# Altium PCB FPGA电子琴.PcbDoc
Units mm, origin at the board's own origin, x right, y up, seen from the top; angles counter-clockwise.
Board outline 93.09 x 116.84 mm, 2 copper layers (Top Layer, Bottom Layer); 37 components, 51 nets, 275 pads, 0 vias.
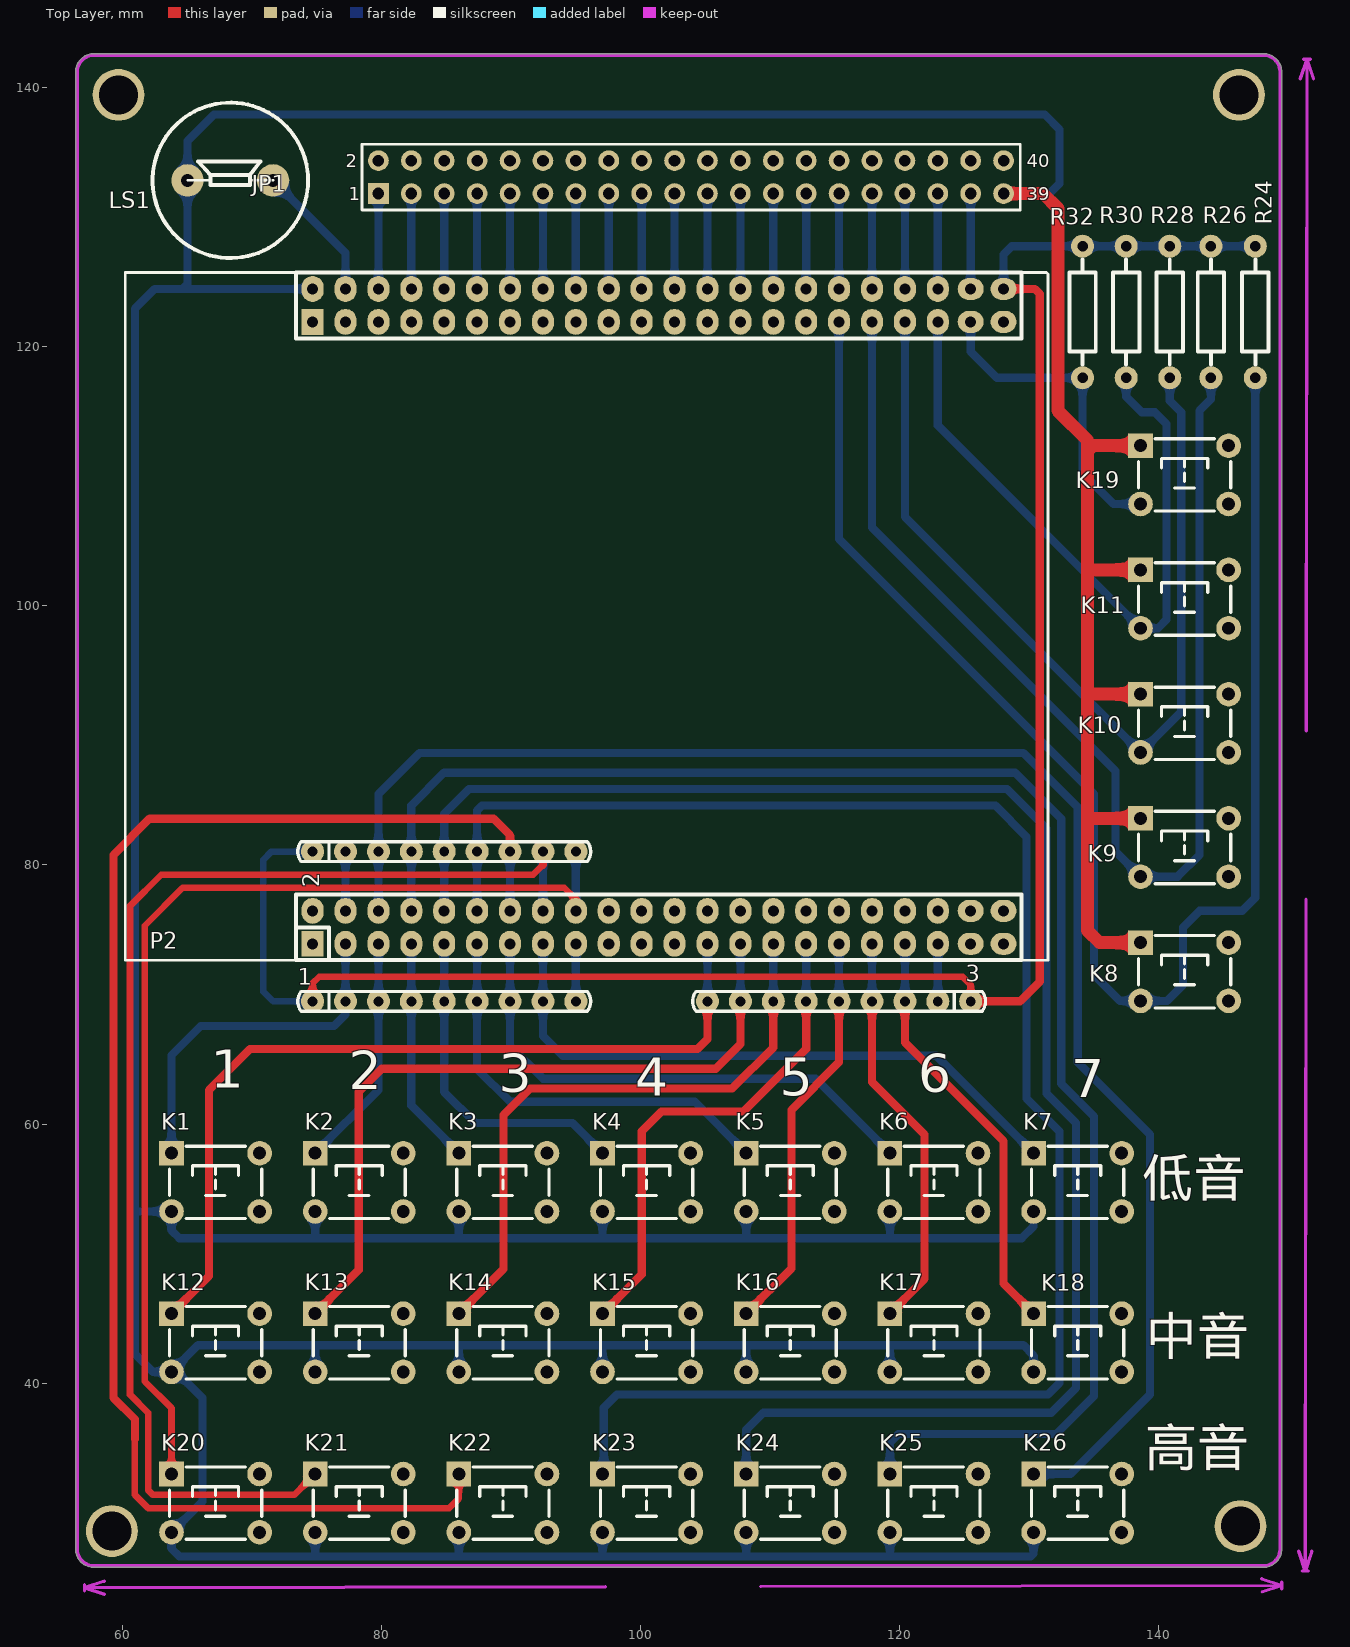
[diagram p0: Top Layer view]
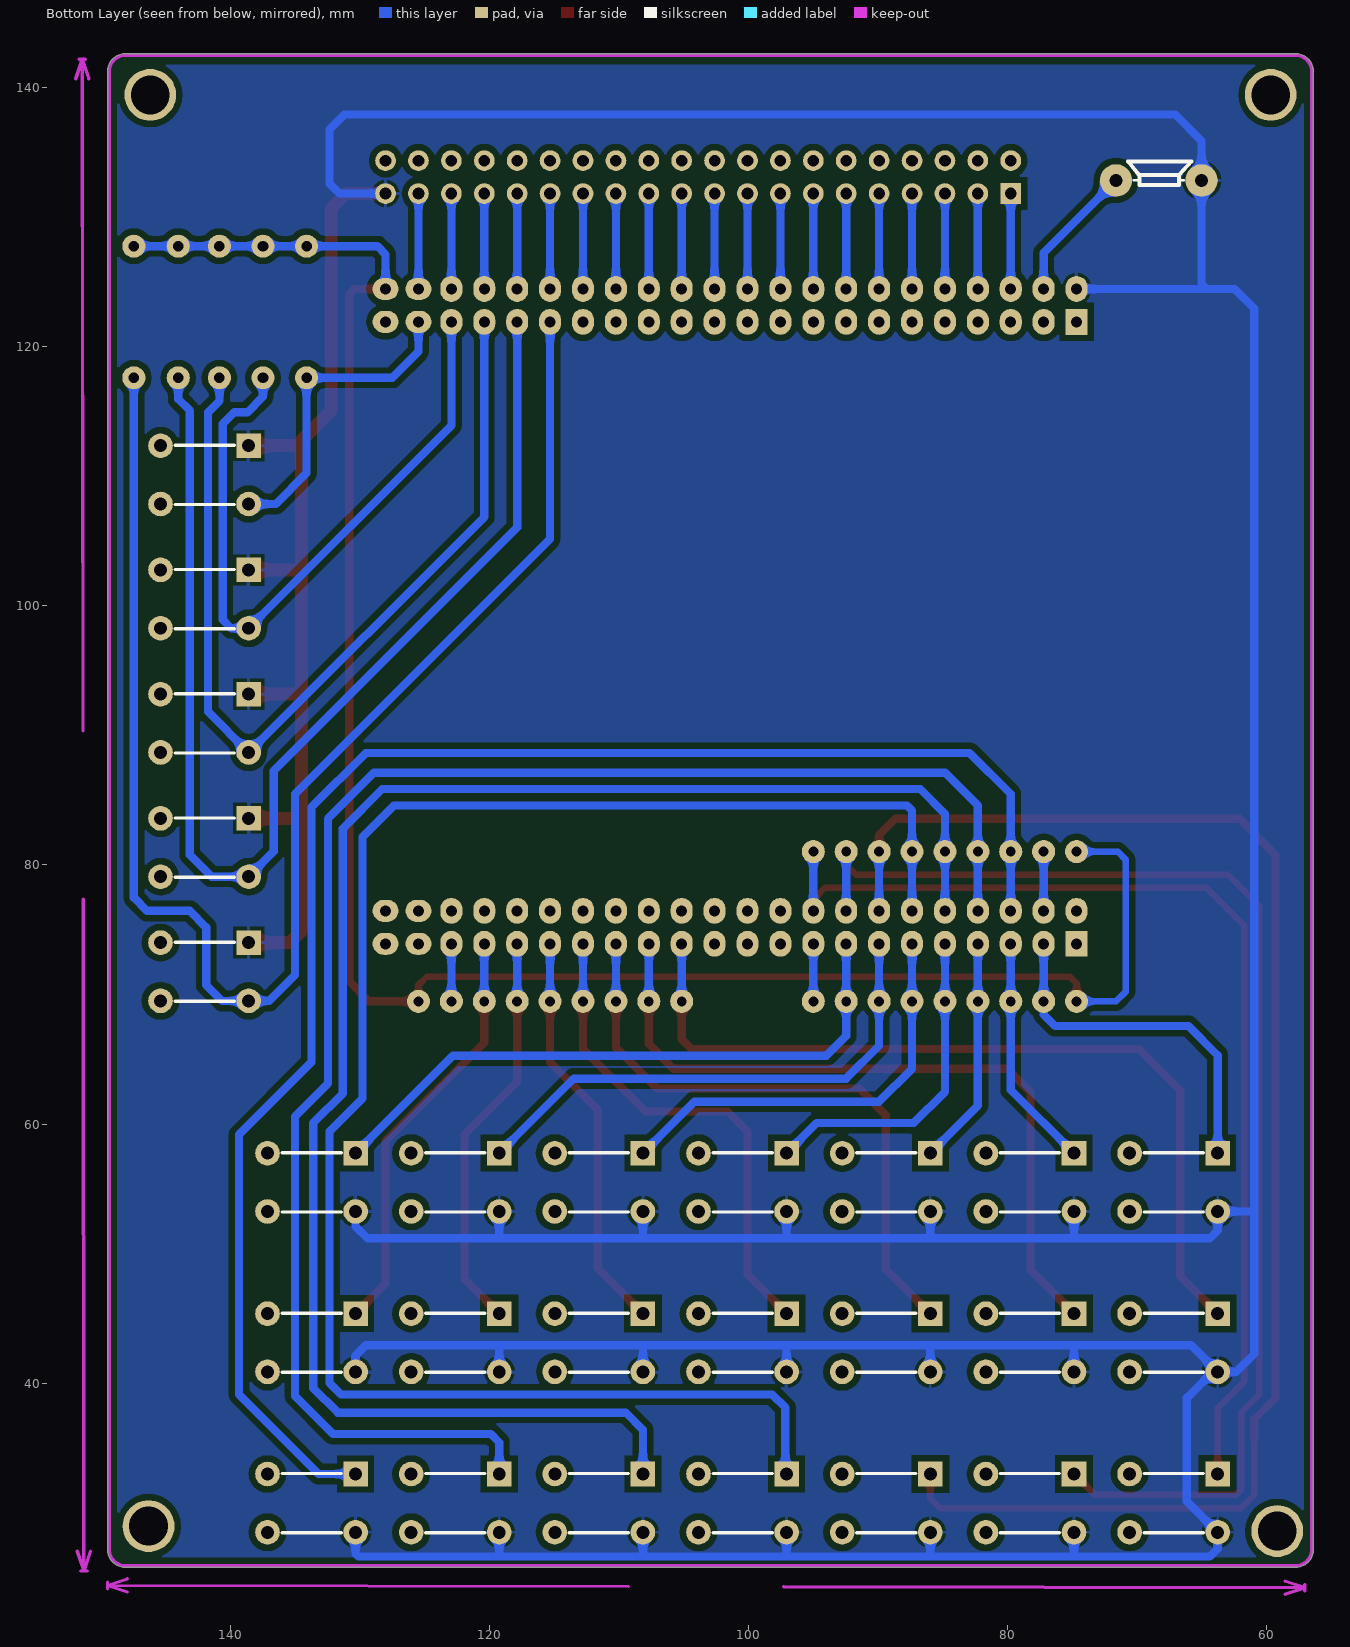
[diagram p1: Bottom Layer view, seen from below]

## Layer stack, top to bottom
Top Solder: solder mask 0.0102, Solder Resist, Dk 3.5
Top Layer: signal copper 0.0356
Dielectric 1: dielectric 0.32, FR-4, Dk 4.8
Bottom Layer: signal copper 0.0356
Bottom Solder: solder mask 0.0102, Solder Resist, Dk 3.5

## Board outline
56.388,27.178 ccw(c57.785,27.178) 57.605,25.792 ccw(c57.658,25.908) 57.658,25.781 148.082,25.781 ccw(c148.082,27.178) 149.479,27.178 149.479,141.224 ccw(c148.082,141.224) 148.082,142.621 147.701,142.621 ccw(c147.701,142.494) 147.691,142.621 59.319,142.621 ccw(c59.309,142.494) 59.309,142.621 57.785,142.621 ccw(c57.785,141.224) 56.388,141.224

## Design rules (kind name [scope] priority, off if disabled: settings)
Clearance Clearance_1 [InPolygon] p1: gap=0.5
Clearance [All] p2: gap=0.254
PolygonConnect [All] p1: connectstyle=Relief reliefconductorwidth=0.254 reliefentries=4 polygonreliefangle="90 Angle" airgapwidth=0.254
RoutingVias [All] p1: holewidth=0.711 width=1.27 viastyle="Through Hole" minholewidth=0.711 minwidth=1.27 maxholewidth=0.711 maxwidth=1.27
SolderMaskExpansion [All] p1: expansion=0.102
Width [All] p1: maxlimit=2 minlimit=0.254 preferedwidth=0.254
30 further rules are at their usual default settings.

## Components (designator, comment, footprint, x,y, rotation, side; value= is the part's Value field where it differs from the comment)
1 "4.7K" 排阻8位 74.676,69.469 r90 top
2 "4.7K" 排阻8位 74.676,81.026 r90 top
3 "4.7K" 排阻8位 125.476,69.469 r270 top
JP1 "Header 2X11" HDR2.54-LI-2x20P 103.886,133.096 r0 top
K1 "SW_PB" "SW DIP-6*6*5" 67.183,55.499 r0 top
K2 "SW_PB" "SW DIP-6*6*5" 78.274,55.499 r0 top
K3 "SW_PB" "SW DIP-6*6*5" 89.366,55.499 r0 top
K4 "SW_PB" "SW DIP-6*6*5" 100.457,55.499 r0 top
K5 "SW_PB" "SW DIP-6*6*5" 111.548,55.499 r0 top
K6 "SW_PB" "SW DIP-6*6*5" 122.64,55.499 r0 top
K7 "SW_PB" "SW DIP-6*6*5" 133.731,55.499 r0 top
K8 "SW-PB" "SW DIP-6*6*5" 141.986,71.755 r0 top
K9 "SW-PB" "SW DIP-6*6*5" 141.986,81.343 r0 top
K10 "SW-PB" "SW DIP-6*6*5" 141.986,90.932 r0 top
K11 "SW-PB" "SW DIP-6*6*5" 141.986,100.52 r0 top
K12 "SW_PB" "SW DIP-6*6*5" 67.183,43.116 r0 top
K13 "SW_PB" "SW DIP-6*6*5" 78.274,43.116 r0 top
K14 "SW_PB" "SW DIP-6*6*5" 89.366,43.116 r0 top
K15 "SW_PB" "SW DIP-6*6*5" 100.457,43.116 r0 top
K16 "SW_PB" "SW DIP-6*6*5" 111.548,43.116 r0 top
K17 "SW_PB" "SW DIP-6*6*5" 122.64,43.116 r0 top
K18 "SW_PB" "SW DIP-6*6*5" 133.731,43.116 r0 top
K19 "SW-PB" "SW DIP-6*6*5" 141.986,110.109 r0 top
K20 "SW_PB" "SW DIP-6*6*5" 67.183,30.734 r0 top
K21 "SW_PB" "SW DIP-6*6*5" 78.274,30.734 r0 top
K22 "SW_PB" "SW DIP-6*6*5" 89.366,30.734 r0 top
K23 "SW_PB" "SW DIP-6*6*5" 100.457,30.734 r0 top
K24 "SW_PB" "SW DIP-6*6*5" 111.548,30.734 r0 top
K25 "SW_PB" "SW DIP-6*6*5" 122.64,30.734 r0 top
K26 "SW_PB" "SW DIP-6*6*5" 133.731,30.734 r0 top
LS1 "SPEAKER2" 喇叭12X6.6 65.024,132.842 r0 top
P2 "FPGA EP2C5_BOARD" IDC88FPGA 74.676,73.914 r90 top locked
R24 "10k" AXIAL0.4 147.447,122.682 r90 top
R26 "10k" AXIAL0.4 144.018,122.682 r90 top
R28 "10k" AXIAL0.4 140.843,122.682 r90 top
R30 "10k" AXIAL0.4 137.477,122.682 r90 top
R32 "10k" AXIAL0.4 134.112,122.682 r90 top

## Footprints (in the part's own frame and the unit in brackets; to place one, negate y for a bottom-side part, rotate by r counter-clockwise, add the part's x,y. Pads: shape width x height; smd on the part's side, far side on the other; paste and mask are expansions set on the pad)
AXIAL0.4 [mil]
  round 70 hole 32: 1(-200,0) 2(200,0)
  silkscreen extent -160,-40 160,40, body extent -213,-44 209,44, height 94
HDR2.54-LI-2x20P [mm] "双排排针，20x2脚"
  rect 1.6x1.6 hole 0.9: 1(-24.13,-1.27)
  round 1.6 hole 0.9: 2(-24.13,1.27) 3(-21.59,-1.27) 4(-21.59,1.27) 5(-19.05,-1.27) 6(-19.05,1.27) 7(-16.51,-1.27) 8(-16.51,1.27) 9(-13.97,-1.27) 10(-13.97,1.27) 11(-11.43,-1.27) 12(-11.43,1.27) 13(-8.89,-1.27) 14(-8.89,1.27) 15(-6.35,-1.27) 16(-6.35,1.27) 17(-3.81,-1.27) 18(-3.81,1.27) 19(-1.27,-1.27) 20(-1.27,1.27) 21(1.27,-1.27) 22(1.27,1.27) 23(3.81,-1.27) 24(3.81,1.27) 25(6.35,-1.27) 26(6.35,1.27) 27(8.89,-1.27) 28(8.89,1.27) 29(11.43,-1.27) 30(11.43,1.27) 31(13.97,-1.27) 32(13.97,1.27) 33(16.51,-1.27) 34(16.51,1.27) 35(19.05,-1.27) 36(19.05,1.27) 37(21.59,-1.27) 38(21.59,1.27) 39(24.13,-1.27) 40(24.13,1.27)
  silkscreen extent -25.4,-2.54 25.4,2.54, body extent -25.4,-2.54 25.4,2.54, height 8.5
IDC88FPGA [mm]
  rect 2x1.7 hole 0.85: 1(0,0) 87(48.006,0)
  oval 2x1.7 hole 0.85: 2(2.54,0) 3(0,-2.54) 4(2.54,-2.54) 5(0,-5.08) 6(2.54,-5.08) 7(0,-7.62) 8(2.54,-7.62) 9(0,-10.16) 10(2.54,-10.16) 11(0,-12.7) 12(2.54,-12.7) 13(0,-15.24) 14(2.54,-15.24) 15(0,-17.78) 16(2.54,-17.78) 17(0,-20.32) 18(2.54,-20.32) 19(0,-22.86) 20(2.54,-22.86) 21(0,-25.4) 22(2.54,-25.4) 23(0,-27.94) 24(2.54,-27.94) 25(0,-30.48) 26(2.54,-30.48) 27(0,-33.02) 28(2.54,-33.02) 29(0,-35.56) 30(2.54,-35.56) 31(0,-38.1) 32(2.54,-38.1) 33(0,-40.64) 34(2.54,-40.64) 35(0,-43.18) 36(2.54,-43.18) 37(0,-45.72) 38(2.54,-45.72) 39(0,-48.26) 40(2.54,-48.26) 49(48.006,-48.26) 50(50.546,-48.26) 51(48.006,-45.72) 52(50.546,-45.72) 53(48.006,-43.18) 54(50.546,-43.18) 55(48.006,-40.64) 56(50.546,-40.64) 57(48.006,-38.1) 58(50.546,-38.1) 59(48.006,-35.56) 60(50.546,-35.56) 61(48.006,-33.02) 62(50.546,-33.02) 63(48.006,-30.48) 64(50.546,-30.48) 65(48.006,-27.94) 66(50.546,-27.94) 67(48.006,-25.4) 68(50.546,-25.4) 69(48.006,-22.86) 70(50.546,-22.86) 71(48.006,-20.32) 72(50.546,-20.32) 73(48.006,-17.78) 74(50.546,-17.78) 75(48.006,-15.24) 76(50.546,-15.24) 77(48.006,-12.7) 78(50.546,-12.7) 79(48.006,-10.16) 80(50.546,-10.16) 81(48.006,-7.62) 82(50.546,-7.62) 83(48.006,-5.08) 84(50.546,-5.08) 85(48.006,-2.54) 86(50.546,-2.54) 88(50.546,0)
  oval 1.7x2 hole 0.85: 41(0,-50.8) 42(2.54,-50.8) 43(0,-53.34) 44(2.54,-53.34) 45(48.006,-53.34) 46(50.546,-53.34) 47(48.006,-50.8) 48(50.546,-50.8)
  silkscreen extent -1.27,-56.77 51.82,14.48
"SW DIP-6*6*5" [mm] "6*6*5mm"
  rect 1.9x1.9 hole 1: 1(-3.4,2.25)
  round 1.9 hole 1: 2(-3.4,-2.25) 3(3.4,-2.25) 4(3.4,2.25)
  silkscreen extent -3.56,-2.79 3.56,2.79, body extent -4.11,-3 4.11,3, height 4.95
喇叭12X6.6 [mm]
  round 2.5 hole 1: 1(0,0) 2(6.6,0)
  silkscreen extent -2.7,-6 9.3,6
排阻8位 [mil]
  round 70 hole 30: 1(0,0) 2(0,-100) 3(0,-200) 4(0,-300) 5(0,-400) 6(0,-500) 7(0,-600) 8(0,-700) 9(0,-800)
  silkscreen extent -30,-845 30,45

## Part data
1 2 3: library part RES8
JP1: library part "Header 20X2", "20*2P接插件"
K1 K2 K3 K4 K5 K6 K7 K12 K13 K14 K15 K16 K17 K18 K20 K21 K22 K23 K24 K25 K26: "微动开关"
LS1: "喇叭"
P2: library part EP2C5_BOARD, "FPGA"
R24 R26 R28 R30 R32: library part RES2

## Free pads (board coordinates)
  round 4 hole 3: 0(59.182,28.575) 0(59.69,139.446) 0(146.177,139.446) 0(146.304,28.956)

## Nets (pads, with @x,y where several pads share a name; then routed paths per layer and width w, separated by ;. In a path a pad name is that pad's centre, name@x,y a point inside that pad or via, vN(x,y) a via of type N, cw(c..) or ccw(c..) an arc to the next point about the centre after c; other vN are vias at no path point)
GND: JP1.39 K1.2 K2.2 K3.2 K4.2 K5.2 K6.2 K7.2 K8.1 K9.1 K10.1 K11.1 K12.2 K13.2 K14.2 K15.2 K16.2 K17.2 K18.2 K19.1 K20.2 K21.2 K22.2 K23.2 K24.2 K25.2 K26.2 LS1.1 P2.88 | length 526.6
  Top Layer w1: JP1.39 131.064,131.826 132.207,130.683 132.207,115.062 134.493,112.776 134.493,111.942 ; K8.1 135.418,74.005 134.493,74.93 134.493,83.693 ; K9.1 134.592,83.594 134.493,83.693 ; K10.1 134.584,93.182 134.493,93.091 ; K11.1 134.521,102.771 134.493,102.743 ; K19.1 134.91,112.359 134.493,111.942 ; 134.493,83.693 134.493,93.091 ; 134.493,93.091 134.493,102.743 ; 134.493,102.743 134.493,111.942
  Bottom Layer w0.635: P2.88 64.643,124.46 ; K21.2 74.874,26.662 74.93,26.607 ; K13.2 74.874,42.87 74.93,42.926 ; K2.2 74.874,51.237 74.93,51.181 ; K22.2 85.966,26.72 85.852,26.607 ; K14.2 85.966,42.786 86.106,42.926 ; K3.2 85.966,51.295 85.852,51.181 ; K23.2 97.057,26.762 96.901,26.607 ; K15.2 97.057,42.828 97.155,42.926 ; K4.2 97.057,51.337 96.901,51.181 ; K24.2 108.148,26.805 107.95,26.607 ; K16.2 108.148,42.855 108.077,42.926 ; K5.2 108.148,51.379 107.95,51.181 ; K25.2 119.24,26.62 119.253,26.607 ; K17.2 119.24,42.913 119.253,42.926 ; K6.2 119.24,51.194 119.253,51.181 ; JP1.39 131.572,131.826 132.334,132.588 132.334,136.779 131.191,137.922 67.056,137.922 65.024,135.89 LS1.1 65.024,124.841 64.643,124.46 ; K26.2 130.331,26.826 130.112,26.607 119.253,26.607 ; K18.2 130.331,42.135 129.54,42.926 119.253,42.926 ; K7.2 130.331,52.099 129.413,51.181 119.253,51.181 ; 60.96,53.34 60.96,42.263 62.357,40.866 K12.2 ; 60.96,53.34 60.96,122.936 62.484,124.46 64.643,124.46 ; 60.96,53.34 61.051,53.249 K1.2 63.783,51.787 64.389,51.181 74.93,51.181 ; K12.2 64.163,40.866 66.167,38.862 66.167,30.868 K20.2 63.783,27.213 64.389,26.607 74.93,26.607 ; K12.2 65.842,42.926 74.93,42.926 ; 74.93,26.607 85.852,26.607 ; 74.93,42.926 86.106,42.926 ; 74.93,51.181 85.852,51.181 ; 85.852,26.607 96.901,26.607 ; 85.852,51.181 96.901,51.181 ; 86.106,42.926 97.155,42.926 ; 96.901,26.607 107.95,26.607 ; 96.901,51.181 107.95,51.181 ; 97.155,42.926 108.077,42.926 ; 107.95,26.607 119.253,26.607 ; 107.95,51.181 119.253,51.181 ; 108.077,42.926 119.253,42.926
H1: 2.9 K20.1 P2.18 | length 83.5
  Top Layer w0.508: K20.1 63.783,38.071 61.722,40.132 61.722,75.311 64.643,78.232 94.107,78.232 94.996,77.343 P2.18
  Bottom Layer w0.635: P2.18 2.9
H2: 2.8 K21.1 P2.16 | length 98.2
  Top Layer w0.508: K21.1 73.259,31.369 62.357,31.369 61.976,31.75 61.976,37.719 60.579,39.116 60.579,76.835 62.992,79.248 91.694,79.248 92.456,80.01
  Top Layer w0.635: 92.456,80.01 2.8
  Bottom Layer w0.635: P2.16 2.8
H3: 2.7 K22.1 P2.14 | length 115.8
  Top Layer w0.508: 60.96,35.687 60.96,31.369 61.976,30.353 85.217,30.353 85.966,31.102 K22.1
  Top Layer w0.635: 60.96,35.687 60.96,37.211 59.309,38.862 59.309,80.772 62.103,83.566 88.646,83.566 89.916,82.296 2.7
  Bottom Layer w0.635: P2.14 2.7
H4: 2.6 K23.1 P2.12 | length 135.7
  Bottom Layer w0.635: P2.12 2.6 87.376,84.201 87.757,84.582 127.381,84.582 129.794,82.169 129.794,61.976 132.334,59.436 132.334,40.005 131.445,39.116 98.171,39.116 97.155,38.1 97.155,33.082 K23.1
H5: 2.5 K24.1 P2.10 | length 130.4
  Bottom Layer w0.635: P2.10 2.5 84.836,83.947 86.741,85.852 128.27,85.852 131.318,82.804 131.318,62.357 133.604,60.071 133.604,39.624 131.699,37.719 109.474,37.719 108.148,36.393 K24.1
H6: 2.4 K25.1 P2.8 | length 126.1
  Bottom Layer w0.635: P2.8 2.4 82.296,84.582 84.836,87.122 128.905,87.122 132.461,83.566 132.461,63.119 135.001,60.579 135.001,38.989 132.08,36.068 119.888,36.068 119.24,35.42 K25.1
H7: 2.3 K26.1 P2.6 | length 125.2
  Bottom Layer w0.635: P2.6 2.3 79.756,85.471 82.931,88.646 129.54,88.646 133.731,84.455 133.731,64.77 139.319,59.182 139.319,39.116 133.187,32.984 K26.1
H8: 2.2 P2.4 | length 4.6
  Bottom Layer w0.635: P2.4 2.2
KEY1: K8.2 P2.55 R24.1 | length 117.9
  Bottom Layer w0.635: P2.55 115.316,105.156 135.001,85.471 135.001,71.501 136.997,69.505 K8.2 140.625,69.505 141.859,70.739 141.859,75.184 143.129,76.454 146.431,76.454 147.447,77.47 R24.1
KEY2: K9.2 P2.53 R26.1 | length 93.8
  Bottom Layer w0.635: P2.53 117.856,106.045 136.652,87.249 136.652,81.027 K9.2 141.45,79.093 143.129,80.772 143.129,115.062 144.018,115.951 R26.1
KEY3: K10.2 P2.51 R28.1 | length 71.4
  Bottom Layer w0.635: P2.51 120.396,106.872 K10.2 141.732,91.828 141.732,114.935 140.843,115.824 R28.1
KEY4: K11.2 P2.49 R30.1 | length 53
  Bottom Layer w0.635: P2.49 122.936,113.92 K11.2 139.926,98.27 140.589,98.933 140.589,114.046 139.7,114.935 138.684,114.935 137.477,116.141 R30.1
KEY5: K19.2 P2.47 R32.1 | length 24.6
  Bottom Layer w0.635: P2.47 125.476,119.634 127.508,117.602 R32.1 134.112,110.236 136.489,107.859 K19.2
L1: 1.2 K1.1 P2.3 | length 27.8
  Bottom Layer w0.635: K1.1 63.783,65.307 66.04,67.564 76.327,67.564 77.216,68.453 1.2 P2.3
L2: 1.3 K2.1 P2.5 | length 18.2
  Bottom Layer w0.635: K2.1 79.756,62.631 1.3 P2.5
L3: 1.4 K3.1 P2.7 | length 17.7
  Bottom Layer w0.635: P2.7 1.4 82.296,61.419 K3.1
L4: 1.5 K4.1 P2.9 | length 25.6
  Bottom Layer w0.635: P2.9 1.5 84.836,62.484 87.249,60.071 94.735,60.071 K4.1
L5: 1.6 K5.1 P2.11 | length 33.1
  Bottom Layer w0.635: P2.11 1.6 87.376,64.262 89.916,61.722 104.175,61.722 K5.1
L6: 1.7 K6.1 P2.13 | length 40.6
  Bottom Layer w0.635: P2.13 1.7 89.916,66.04 92.456,63.5 113.489,63.5 K6.1
L7: 1.8 K7.1 P2.15 | length 48.7
  Bottom Layer w0.635: P2.15 1.8 92.456,66.802 93.98,65.278 122.802,65.278 K7.1
L8: 1.9 P2.17 | length 4.4
  Bottom Layer w0.635: 1.9 P2.17
M1: 3.9 K12.1 P2.25 | length 65.9
  Top Layer w0.635: K12.1 66.675,48.259 66.675,62.611 69.85,65.786 104.394,65.786 105.156,66.548 3.9
  Bottom Layer w0.635: 3.9 P2.25
M2: 3.8 K13.1 P2.27 | length 57.2
  Top Layer w0.635: K13.1 78.232,48.724 78.232,62.484 80.01,64.262 105.791,64.262 107.696,66.167 3.8
  Bottom Layer w0.635: 3.8 P2.27
M3: 3.7 K14.1 P2.29 | length 47.8
  Top Layer w0.635: K14.1 89.408,48.809 89.408,60.706 91.44,62.738 107.061,62.738 110.236,65.913 3.7
  Bottom Layer w0.635: 3.7 P2.29
M4: 3.6 K15.1 P2.31 | length 38.8
  Top Layer w0.635: K15.1 100.076,48.386 100.076,59.436 101.6,60.96 107.95,60.96 112.776,65.786 3.6
  Bottom Layer w0.635: 3.6 P2.31
M5: 3.5 K16.1 P2.33 | length 31.5
  Top Layer w0.635: K16.1 111.633,48.851 111.633,61.087 115.316,64.77 3.5
  Bottom Layer w0.635: 3.5 P2.33
M6: 3.4 K17.1 P2.35 | length 31.3
  Top Layer w0.635: 3.4 117.856,63.246 121.92,59.182 121.92,48.047 K17.1
  Bottom Layer w0.635: 3.4 P2.35
M7: 3.3 K18.1 P2.37 | length 32.7
  Top Layer w0.635: 3.3 120.396,66.294 128.016,58.674 128.016,47.681 K18.1
  Bottom Layer w0.635: 3.3 P2.37
M8: 3.2 P2.39 | length 4.4
  Bottom Layer w0.635: 3.2 P2.39
NetJP1_1: JP1.1 P2.84 | length 7.4
  Bottom Layer w0.635: P2.84 JP1.1
NetJP1_3: JP1.3 P2.82 | length 7.4
  Bottom Layer w0.635: P2.82 JP1.3
NetJP1_5: JP1.5 P2.80 | length 7.4
  Bottom Layer w0.635: P2.80 JP1.5
NetJP1_7: JP1.7 P2.78 | length 7.4
  Bottom Layer w0.635: P2.78 JP1.7
NetJP1_9: JP1.9 P2.76 | length 7.4
  Bottom Layer w0.635: P2.76 JP1.9
NetJP1_11: JP1.11 P2.74 | length 7.4
  Bottom Layer w0.635: P2.74 JP1.11
NetJP1_13: JP1.13 P2.72 | length 7.4
  Bottom Layer w0.635: P2.72 JP1.13
NetJP1_15: JP1.15 P2.70 | length 7.4
  Bottom Layer w0.635: P2.70 JP1.15
NetJP1_17: JP1.17 P2.68 | length 7.4
  Bottom Layer w0.635: P2.68 JP1.17
NetJP1_19: JP1.19 P2.66 | length 7.4
  Bottom Layer w0.635: P2.66 JP1.19
NetJP1_21: JP1.21 P2.64 | length 7.4
  Bottom Layer w0.635: P2.64 JP1.21
NetJP1_23: JP1.23 P2.62 | length 7.4
  Bottom Layer w0.635: P2.62 JP1.23
NetJP1_25: JP1.25 P2.60 | length 7.4
  Bottom Layer w0.635: P2.60 JP1.25
NetJP1_27: JP1.27 P2.58 | length 7.4
  Bottom Layer w0.635: P2.58 JP1.27
NetJP1_29: JP1.29 P2.56 | length 7.4
  Bottom Layer w0.635: P2.56 JP1.29
NetJP1_31: JP1.31 P2.54 | length 7.4
  Bottom Layer w0.635: P2.54 JP1.31
NetJP1_33: JP1.33 P2.52 | length 7.4
  Bottom Layer w0.635: P2.52 JP1.33
NetJP1_35: JP1.35 P2.50 | length 7.4
  Bottom Layer w0.635: P2.50 JP1.35
NetJP1_37: JP1.37 P2.48 | length 7.4
  Bottom Layer w0.635: P2.48 JP1.37
NetLS1_2: LS1.2 P2.86 | length 10.7
  Bottom Layer w0.635: LS1.2 77.216,127.25 P2.86
VCCIO: 1.1 2.1 3.1 P2.46 R24.2 R26.2 R28.2 R30.2 R32.2 | length 156.8
  Top Layer w0.508: 1.1 74.676,70.866 75.184,71.374 124.841,71.374 125.476,70.739 3.1
  Top Layer w0.635: 3.1 129.286,69.469 130.81,70.993 130.81,124.079 130.429,124.46 P2.46
  Bottom Layer w0.508: 1.1 71.628,69.469 70.866,70.231 70.866,80.391 71.501,81.026 2.1
  Bottom Layer w0.635: P2.46 128.016,127.127 128.651,127.762 R32.2 R30.2 R28.2 R24.2@147.574,127.762
pads on no net: JP1.2 JP1.4 JP1.6 JP1.8 JP1.10 JP1.12 JP1.14 JP1.16 JP1.18 JP1.20 JP1.22 JP1.24 JP1.26 JP1.28 JP1.30 JP1.32 JP1.34 JP1.36 JP1.38 JP1.40 K1.3 K1.4 K2.3 K2.4 K3.3 K3.4 K4.3 K4.4 K5.3 K5.4 K6.3 K6.4 K7.3 K7.4 K8.3 K8.4 K9.3 K9.4 K10.3 K10.4 K11.3 K11.4 K12.3 K12.4 K13.3 K13.4 K14.3 K14.4 K15.3 K15.4 K16.3 K16.4 K17.3 K17.4 K18.3 K18.4 K19.3 K19.4 K20.3 K20.4 K21.3 K21.4 K22.3 K22.4 K23.3 K23.4 K24.3 K24.4 K25.3 K25.4 K26.3 K26.4 P2.1 P2.2 P2.19 P2.20 P2.21 P2.22 P2.23 P2.24 P2.26 P2.28 P2.30 P2.32 P2.34 P2.36 P2.38 P2.40 P2.41 P2.42 P2.43 P2.44 P2.45 P2.57 P2.59 P2.61 P2.63 P2.65 P2.67 P2.69 P2.71 P2.73 P2.75 P2.77 P2.79 P2.81 P2.83 P2.85 P2.87

## Polygon pours and split planes (outlines as drawn)
GND on Bottom Layer "Bottom Layer-No Net" (solid, remove dead copper, pour order 2): 56.642,142.875 57.758,141.759 149.373,141.759 149.373,26.308 147.954,24.889 147.062,25.781 56.388,25.781 56.388,142.494

## Keep-outs
Keep-Out Layer:
  lines w0.254: 57.062,24.455 57.063,23.947 ; 57.658,25.908 147.447,25.908 ; 57.785,25.908 cw(c57.785,27.178) 56.515,27.178 56.515,141.224 cw(c57.785,141.224) 57.785,142.494 59.309,142.494 ; 58.586,24.712 57.063,24.201 ; 58.588,23.696 57.063,24.201 ; 58.674,142.494 147.955,142.494 ; 97.278,24.281 57.063,24.201 ; 109.264,24.305 149.479,24.384 ; 146.685,25.908 148.082,25.908 ccw(c148.082,27.178) 149.352,27.178 149.352,28.956 ; 147.701,142.494 148.082,142.494 cw(c148.082,141.224) 149.352,141.224 149.352,140.081 ; 147.954,24.889 149.479,24.384 ; 147.956,23.873 149.479,24.384 ; 149.352,27.559 149.352,140.462 ; 149.48,24.13 149.478,24.638 ; 150.796,27.012 151.302,25.488 ; 150.919,140.677 151.429,142.201 ; 151.048,25.488 151.556,25.488 ; 151.175,142.201 151.683,142.201 ; 151.359,77.344 151.302,25.488 ; 151.373,90.345 151.429,142.201 ; 151.812,27.011 151.302,25.488 ; 151.935,140.676 151.429,142.201
  text "116.713mm" at 152.273,77.597 h1.52 r89.94
  text "92.416mm" at 97.534,23.367 h1.52 r0.11

## Silkscreen, mask and mechanical layers (free items; w line width, h text height)
Top Overlay:
  text "1" at 66.802,61.849 h5
  text "2" at 77.47,61.722 h5
  text "3" at 89.027,61.468 h5
  text "6" at 121.412,61.468 h5
  text "4" at 99.568,61.214 h5
  text "5" at 110.744,61.214 h5
  text "7" at 133.223,61.087 h5
  text "低音" at 138.684,53.467 h5
  text "中音" at 138.938,41.275 h5
  text "高音" at 138.938,32.639 h5

## Text inside footprints (layer, text, board x,y; h text height)
JP1: Top Overlay "39" at 129.794,131.318 h1.02; Top Overlay "40" at 129.794,133.858 h1.02; Top Overlay "2" at 77.216,133.858 h1.02; Top Overlay "1" at 77.47,131.318 h1.02